# Altium PCB PCB.PcbDoc (part 2 of 7)
Units mm, origin at the board's own origin, x right, y up, seen from the top; angles counter-clockwise.
Board outline 78.8 x 69 mm, 12 copper layers (Top Layer, GND_12, uStrip1, GND_35, Clocks, GND_57, POWER, Slow_Ctrl, GND_810, uStrip2, GND_1012, Bottom Layer), stack 2.926 mm thick; 290 components, 212 nets, 1379 pads, 3418 vias.
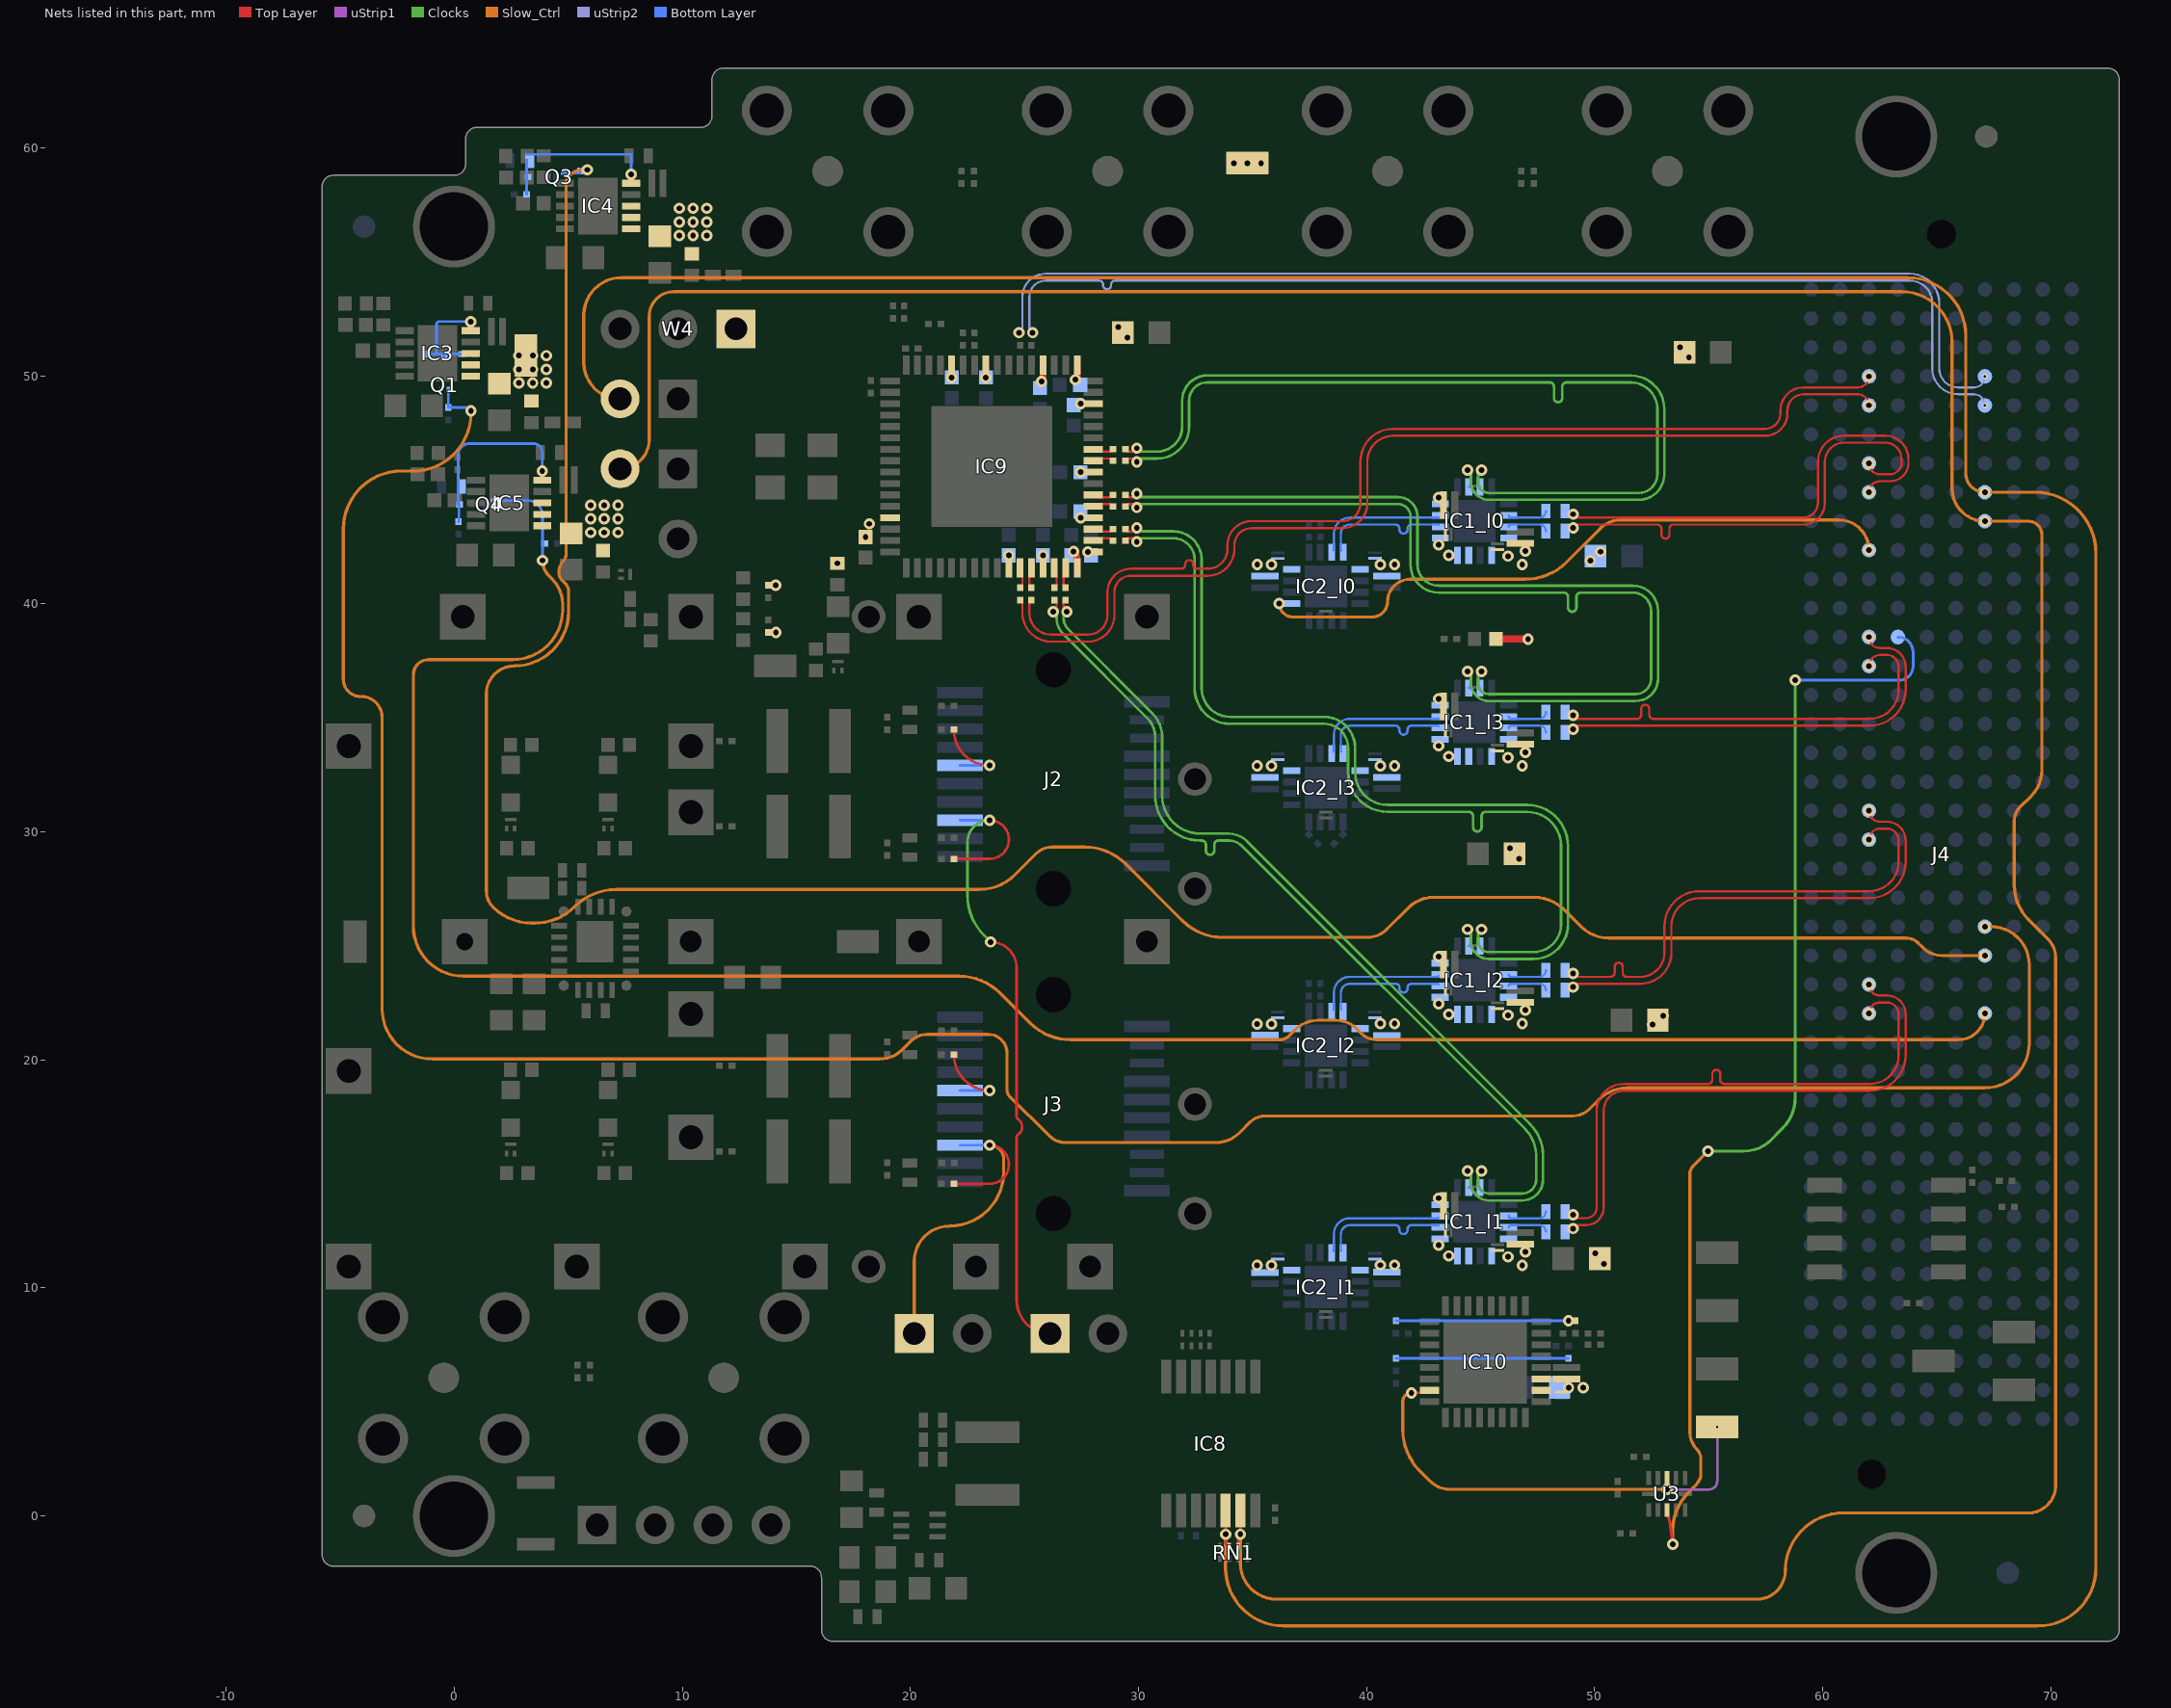
[diagram p12: the nets of this part, all layers, seen from the top]

## Footprints (in the part's own frame and the unit in brackets; to place one, negate y for a bottom-side part, rotate by r counter-clockwise, add the part's x,y. Pads: shape width x height; smd on the part's side, far side on the other; paste and mask are expansions set on the pad) (continued)
SAMTEC_SEAM-40-03.5-S-10-2-A-K-TR [mm]
  round 1.27 hole 1.27 unplated: _1(27.19,0) ""(-27.19,-3.05)
  round 0.64 smd paste+0.125: A1(24.765,5.715) A2(23.495,5.715) A3(22.225,5.715) A4(20.955,5.715) A5(19.685,5.715) A6(18.415,5.715) A7(17.145,5.715) A8(15.875,5.715) A9(14.605,5.715) A10(13.335,5.715) A11(12.065,5.715) A12(10.795,5.715) A13(9.525,5.715) A14(8.255,5.715) A15(6.985,5.715) A16(5.715,5.715) A17(4.445,5.715) A18(3.175,5.715) A19(1.905,5.715) A20(0.635,5.715) A21(-0.635,5.715) A22(-1.905,5.715) A23(-3.175,5.715) A24(-4.445,5.715) A25(-5.715,5.715) A26(-6.985,5.715) A27(-8.255,5.715) A28(-9.525,5.715) A29(-10.795,5.715) A30(-12.065,5.715) A31(-13.335,5.715) A32(-14.605,5.715) A33(-15.875,5.715) A34(-17.145,5.715) A35(-18.415,5.715) A36(-19.685,5.715) A37(-20.955,5.715) A38(-22.225,5.715) A39(-23.495,5.715) A40(-24.765,5.715) B1(24.765,4.445) B2(23.495,4.445) B3(22.225,4.445) B4(20.955,4.445) B5(19.685,4.445) B6(18.415,4.445) B7(17.145,4.445) B8(15.875,4.445) B9(14.605,4.445) B10(13.335,4.445) B11(12.065,4.445) B12(10.795,4.445) B13(9.525,4.445) B14(8.255,4.445) B15(6.985,4.445) B16(5.715,4.445) B17(4.445,4.445) B18(3.175,4.445) B19(1.905,4.445) B20(0.635,4.445) B21(-0.635,4.445) B22(-1.905,4.445) B23(-3.175,4.445) B24(-4.445,4.445) B25(-5.715,4.445) B26(-6.985,4.445) B27(-8.255,4.445) B28(-9.525,4.445) B29(-10.795,4.445) B30(-12.065,4.445) B31(-13.335,4.445) B32(-14.605,4.445) B33(-15.875,4.445) B34(-17.145,4.445) B35(-18.415,4.445) B36(-19.685,4.445) B37(-20.955,4.445) B38(-22.225,4.445) B39(-23.495,4.445) B40(-24.765,4.445) C1(24.765,3.175) C2(23.495,3.175) C3(22.225,3.175) C4(20.955,3.175) C5(19.685,3.175) C6(18.415,3.175) C7(17.145,3.175) C8(15.875,3.175) C9(14.605,3.175) C10(13.335,3.175) C11(12.065,3.175) C12(10.795,3.175) C13(9.525,3.175) C14(8.255,3.175) C15(6.985,3.175) C16(5.715,3.175) C17(4.445,3.175) C18(3.175,3.175) C19(1.905,3.175) C20(0.635,3.175) C21(-0.635,3.175) C22(-1.905,3.175) C23(-3.175,3.175) C24(-4.445,3.175) C25(-5.715,3.175) C26(-6.985,3.175) C27(-8.255,3.175) C28(-9.525,3.175) C29(-10.795,3.175) C30(-12.065,3.175) C31(-13.335,3.175) C32(-14.605,3.175) C33(-15.875,3.175) C34(-17.145,3.175) C35(-18.415,3.175) C36(-19.685,3.175) C37(-20.955,3.175) C38(-22.225,3.175) C39(-23.495,3.175) C40(-24.765,3.175) D1(24.765,1.905) D2(23.495,1.905) D3(22.225,1.905) D4(20.955,1.905) D5(19.685,1.905) D6(18.415,1.905) D7(17.145,1.905) D8(15.875,1.905) D9(14.605,1.905) D10(13.335,1.905) D11(12.065,1.905) D12(10.795,1.905) D13(9.525,1.905) D14(8.255,1.905) D15(6.985,1.905) D16(5.715,1.905) D17(4.445,1.905) D18(3.175,1.905) D19(1.905,1.905) D20(0.635,1.905) D21(-0.635,1.905) D22(-1.905,1.905) D23(-3.175,1.905) D24(-4.445,1.905) D25(-5.715,1.905) D26(-6.985,1.905) D27(-8.255,1.905) D28(-9.525,1.905) D29(-10.795,1.905) D30(-12.065,1.905) D31(-13.335,1.905) D32(-14.605,1.905) D33(-15.875,1.905) D34(-17.145,1.905) D35(-18.415,1.905) D36(-19.685,1.905) D37(-20.955,1.905) D38(-22.225,1.905) D39(-23.495,1.905) D40(-24.765,1.905) E1(24.765,0.635) E2(23.495,0.635) E3(22.225,0.635) E4(20.955,0.635) E5(19.685,0.635) E6(18.415,0.635) E7(17.145,0.635) E8(15.875,0.635) E9(14.605,0.635) E10(13.335,0.635) E11(12.065,0.635) E12(10.795,0.635) E13(9.525,0.635) E14(8.255,0.635) E15(6.985,0.635) E16(5.715,0.635) E17(4.445,0.635) E18(3.175,0.635) E19(1.905,0.635) E20(0.635,0.635) E21(-0.635,0.635) E22(-1.905,0.635) E23(-3.175,0.635) E24(-4.445,0.635) E25(-5.715,0.635) E26(-6.985,0.635) E27(-8.255,0.635) E28(-9.525,0.635) E29(-10.795,0.635) E30(-12.065,0.635) E31(-13.335,0.635) E32(-14.605,0.635) E33(-15.875,0.635) E34(-17.145,0.635) E35(-18.415,0.635) E36(-19.685,0.635) E37(-20.955,0.635) E38(-22.225,0.635) E39(-23.495,0.635) E40(-24.765,0.635) F1(24.765,-0.635) F2(23.495,-0.635) F3(22.225,-0.635) F4(20.955,-0.635) F5(19.685,-0.635) F6(18.415,-0.635) F7(17.145,-0.635) F8(15.875,-0.635) F9(14.605,-0.635) F10(13.335,-0.635) F11(12.065,-0.635) F12(10.795,-0.635) F13(9.525,-0.635) F14(8.255,-0.635) F15(6.985,-0.635) F16(5.715,-0.635) F17(4.445,-0.635) F18(3.175,-0.635) F19(1.905,-0.635) F20(0.635,-0.635) F21(-0.635,-0.635) F22(-1.905,-0.635) F23(-3.175,-0.635) F24(-4.445,-0.635) F25(-5.715,-0.635) F26(-6.985,-0.635) F27(-8.255,-0.635) F28(-9.525,-0.635) F29(-10.795,-0.635) F30(-12.065,-0.635) F31(-13.335,-0.635) F32(-14.605,-0.635) F33(-15.875,-0.635) F34(-17.145,-0.635) F35(-18.415,-0.635) F36(-19.685,-0.635) F37(-20.955,-0.635) F38(-22.225,-0.635) F39(-23.495,-0.635) F40(-24.765,-0.635) G1(24.765,-1.905) G2(23.495,-1.905) G3(22.225,-1.905) G4(20.955,-1.905) G5(19.685,-1.905) G6(18.415,-1.905) G7(17.145,-1.905) G8(15.875,-1.905) G9(14.605,-1.905) G10(13.335,-1.905) G11(12.065,-1.905) G12(10.795,-1.905) G13(9.525,-1.905) G14(8.255,-1.905) G15(6.985,-1.905) G16(5.715,-1.905) G17(4.445,-1.905) G18(3.175,-1.905) G19(1.905,-1.905) G20(0.635,-1.905) G21(-0.635,-1.905) G22(-1.905,-1.905) G23(-3.175,-1.905) G24(-4.445,-1.905) G25(-5.715,-1.905) G26(-6.985,-1.905) G27(-8.255,-1.905) G28(-9.525,-1.905) G29(-10.795,-1.905) G30(-12.065,-1.905) G31(-13.335,-1.905) G32(-14.605,-1.905) G33(-15.875,-1.905) G34(-17.145,-1.905) G35(-18.415,-1.905) G36(-19.685,-1.905) G37(-20.955,-1.905) G38(-22.225,-1.905) G39(-23.495,-1.905) G40(-24.765,-1.905) H1(24.765,-3.175) H2(23.495,-3.175) H3(22.225,-3.175) H4(20.955,-3.175) H5(19.685,-3.175) H6(18.415,-3.175) H7(17.145,-3.175) H8(15.875,-3.175) H9(14.605,-3.175) H10(13.335,-3.175) H11(12.065,-3.175) H12(10.795,-3.175) H13(9.525,-3.175) H14(8.255,-3.175) H15(6.985,-3.175) H16(5.715,-3.175) H17(4.445,-3.175) H18(3.175,-3.175) H19(1.905,-3.175) H20(0.635,-3.175) H21(-0.635,-3.175) H22(-1.905,-3.175) H23(-3.175,-3.175) H24(-4.445,-3.175) H25(-5.715,-3.175) H26(-6.985,-3.175) H27(-8.255,-3.175) H28(-9.525,-3.175) H29(-10.795,-3.175) H30(-12.065,-3.175) H31(-13.335,-3.175) H32(-14.605,-3.175) H33(-15.875,-3.175) H34(-17.145,-3.175) H35(-18.415,-3.175) H36(-19.685,-3.175) H37(-20.955,-3.175) H38(-22.225,-3.175) H39(-23.495,-3.175) H40(-24.765,-3.175) I1(24.765,-4.445) I2(23.495,-4.445) I3(22.225,-4.445) I4(20.955,-4.445) I5(19.685,-4.445) I6(18.415,-4.445) I7(17.145,-4.445) I8(15.875,-4.445) I9(14.605,-4.445) I10(13.335,-4.445) I11(12.065,-4.445) I12(10.795,-4.445) I13(9.525,-4.445) I14(8.255,-4.445) I15(6.985,-4.445) I16(5.715,-4.445) I17(4.445,-4.445) I18(3.175,-4.445) I19(1.905,-4.445) I20(0.635,-4.445) I21(-0.635,-4.445) I22(-1.905,-4.445) I23(-3.175,-4.445) I24(-4.445,-4.445) I25(-5.715,-4.445) I26(-6.985,-4.445) I27(-8.255,-4.445) I28(-9.525,-4.445) I29(-10.795,-4.445) I30(-12.065,-4.445) I31(-13.335,-4.445) I32(-14.605,-4.445) I33(-15.875,-4.445) I34(-17.145,-4.445) I35(-18.415,-4.445) I36(-19.685,-4.445) I37(-20.955,-4.445) I38(-22.225,-4.445) I39(-23.495,-4.445) I40(-24.765,-4.445) J1(24.765,-5.715) J2(23.495,-5.715) J3(22.225,-5.715) J4(20.955,-5.715) J5(19.685,-5.715) J6(18.415,-5.715) J7(17.145,-5.715) J8(15.875,-5.715) J9(14.605,-5.715) J10(13.335,-5.715) J11(12.065,-5.715) J12(10.795,-5.715) J13(9.525,-5.715) J14(8.255,-5.715) J15(6.985,-5.715) J16(5.715,-5.715) J17(4.445,-5.715) J18(3.175,-5.715) J19(1.905,-5.715) J20(0.635,-5.715) J21(-0.635,-5.715) J22(-1.905,-5.715) J23(-3.175,-5.715) J24(-4.445,-5.715) J25(-5.715,-5.715) J26(-6.985,-5.715) J27(-8.255,-5.715) J28(-9.525,-5.715) J29(-10.795,-5.715) J30(-12.065,-5.715) J31(-13.335,-5.715) J32(-14.605,-5.715) J33(-15.875,-5.715) J34(-17.145,-5.715) J35(-18.415,-5.715) J36(-19.685,-5.715) J37(-20.955,-5.715) J38(-22.225,-5.715) J39(-23.495,-5.715) J40(-24.765,-5.715)
  silkscreen extent -27.89,-7.34 29.3,7.34, body extent -27.89,-7.34 28.78,7.34, height 7.04
SAMTEC_SMA-J-P-H-ST-MT1 [mm] "50 Ohms SMA Straight Mixed Technology PCB Jack"
  round 1.35 smd: 1(0,0)
  round 2.2 hole 1.5: 2(2.665,-2.665) 2_1(2.665,2.665) 2_2(-2.665,-2.665) 2_3(-2.665,2.665)
  silkscreen extent -3.17,-3.17 3.17,3.17, body extent -3.17,-3.17 3.18,3.18, height 7.95
SOIC127P600X175-8N [mm]
  rect 1.525x0.65 smd: 1(-2.712,1.905) 2(-2.712,0.635) 3(-2.712,-0.635) 4(-2.712,-1.905) 5(2.712,-1.905) 6(2.712,-0.635) 7(2.712,0.635) 8(2.712,1.905)
  silkscreen extent -3.47,-2.45 1.6,2.58, body extent -3,-2.45 3,2.45, height 1.75
SON50P300X300X85-11N-D [mm]
  rect 0.8x0.3 smd: 1(-1.45,1) 2(-1.45,0.5) 3(-1.45,0) 4(-1.45,-0.5) 5(-1.45,-1) 6(1.45,-1) 7(1.45,-0.5) 8(1.45,0) 9(1.45,0.5) 10(1.45,1)
  rect 1.74x2.48 smd: 11(0,0)
  silkscreen extent -1.97,1.53 -1.73,1.77, body extent -1.52,-1.5 1.52,1.5, height 0.76
SOP65P640X120-14N [mm]
  rect 1.475x0.45 smd: 1(-2.938,1.95) 2(-2.938,1.3) 3(-2.938,0.65) 4(-2.938,0) 5(-2.938,-0.65) 6(-2.938,-1.3) 7(-2.938,-1.95) 8(2.938,-1.95) 9(2.938,-1.3) 10(2.938,-0.65) 11(2.938,0) 12(2.938,0.65) 13(2.938,1.3) 14(2.938,1.95)
  silkscreen extent -3.67,-2.5 1.85,2.52, body extent -3.2,-2.5 3.2,2.5, height 1.13
SOT_07SDRLR_TEX [mil]
  rect 28x9 smd paste+0 mask+0: 1(-31.5,19.69) 2(-31.5,0) 3(-31.5,-19.69) 4(31.5,-19.69) 5(31.5,0) 6(31.5,19.69)
  silkscreen extent -71,-39 31,39, body extent -34,-34 34,34, height 24
TP+195X110 [mm]
  rect 1.85x1 smd: 1(0,0)
  body extent -0.8,-0.45 0.8,0.45, height 1.15
TYCO_1888247-1 [mm] "20 Position, Pitch 0.8mm SFP Receptacle (Small Form-factor Pluggable)"
  rect 2x0.5 smd: 1(-4.1,3.395) 2(-4.1,2.595) 3(-4.1,1.795) 4(-4.1,0.995) 5(-4.1,0.195) 6(-4.1,-0.605) 7(-4.1,-1.405) 8(-4.1,-2.205) 9(-4.1,-3.005) 10(-4.1,-3.805) 11(4.1,-3.405) 14(4.1,-1.005) 15(4.1,-0.205) 16(4.1,0.595) 17(4.1,1.395) 20(4.1,3.795)
  rect 1.5x0.4 smd: 12(4.1,-2.605) 13(4.1,-1.805) 18(4.1,2.195) 19(4.1,2.995)
  round 0.5 hole 1.55 unplated mask+0.525: MTG1(0,4.795) MTG2(0,-4.805)
  Top Layer keep-out lines w0.1: -4.34,5.85 -4.34,3.985 -2.78,3.985 -2.78,3.75 2.78,3.75 2.78,4.385 3.94,4.385 3.94,5.85 -4.34,5.85 ; -4.34,-4.395 -2.78,-4.395 -2.78,-3.75 2.78,-3.75 2.78,-3.995 3.94,-3.995 3.94,-5.85 -4.34,-5.85 -4.34,-4.395
  silkscreen extent -42.4,-7.77 6.3,7.77, body extent -4.5,-5.5 4.5,5.5, height 5.22
XTAL_KYOCERA_CX3225SB [mm] "SMD Crystal Kyocera, 4 Pin, 3.2mm L X 2.5mm W X 0.6mm H"
  rect 1.05x1.3 smd: 1(-0.925,1.15) 2(-0.925,-1.15) 3(0.925,-1.15) 4(0.925,1.15)
  silkscreen extent -2.12,-1.65 1.3,1.73, body extent -1.3,-1.65 1.3,1.65, height 0.6

## Part data
C1_l0 C1_l1 C1_l2 C1_l3 C3_l0 C3_l1 C3_l2 C3_l3 C5_l0 C5_l1 C5_l2 C5_l3 C8_l0 C8_l1 C8_l2 C8_l3 C19 C32 C41 C104: library part "Capacitor - non polarized", "LLL153C70G474ME17"
C2_l0 C2_l1 C2_l2 C2_l3 C4_l0 C4_l1 C4_l2 C4_l3 C6_l0 C6_l1 C6_l2 C6_l3 C9_l0 C9_l1 C9_l2 C9_l3 C12_l0 C12_l1 C12_l2 C12_l3 C13_l0 C13_l1 C13_l2 C13_l3 C105: library part "Capacitor - non polarized", "LLL03TR61E333KE01"
C7_l0 C7_l1 C7_l2 C7_l3 C15 C16 C26 C27 C28 C37 C38 C101 C102 C103: library part CC0603_10UF_6.3V_20%_X5R, "C1608X5R1E106M080AC", Case=0603, Manufacturer=GENERIC, Manufacturer1 ComponentHeight=0.95mm, Manufacturer1 Example=KEMET, Manufacturer1 Part Number=C0603C106M9PAC, Manufacturer Part Number=CC0603_10uF_6.3V_20%_X5R, Tolerance=±20%, Voltage=6.3V, Author="CERN DEM JLC", Component Type=Standard, CreateDate=03/12/2007, HelpURL=\\cern.ch\dfs\Applications\Altium\Datasheets\CC0603_X5R_KEMET.pdf, LatestRevisionDate=03/12/2007, Mounted=Yes, Part Description="SMD Multilayer Chip Ceramic Capacitor", Part Number=CC0603_10UF_6.3V_20%_X5R, Pin Count=2, Sense=No, SMD=Yes, Socket=No, Status=Preferred, TC=X5R
C10_l0 C10_l1 C10_l2 C10_l3 C11_l0 C11_l1 C11_l2 C11_l3 C18 C24 C25 C31 C34 C35 C36 C40 C46 C49 C52 C55: library part C0402-22uF-high-density, "GRM155R60J226ME11", Vmax=6.3V
C14 C45 C47 C48 C50 C51 C53 C54 C56 C57 C58 C59 C60 C61 C62 C63 C64 C65 C66 C67 C68 C69 C70 C71 C72 C73 C74 C75 C76 C77 C78 C79 C80 C81 C82 C83 C84 C85 C86 C91 C92 C106 C107: library part C0201-100nF-high-density, "GRM033R61C104KE14", Vmax=16V
C17 C20 C30 C33 C39 C42 C87 C88 C89 C90 C93 C94 C95 C96 C97 C98 C99 C100: library part CC0402_1UF_16V_10%_X5R, "GRM153B30J105ME15", Case=0402, Manufacturer=GENERIC, Manufacturer1 ComponentHeight=0.55mm, Manufacturer1 Example=TDK, Manufacturer1 Part Number=C1005X5R1C105KT, Tolerance=±10%, Voltage=16V, Author="CERN DEM JLC", Component Type=Standard, CreateDate=10/25/2012, HelpURL=\\cern.ch\dfs\Applications\Altium\Datasheets\CC0402_X5R_TDK_C.pdf, LatestRevisionDate=10/25/2012, Manufacturer Part Number=CC0402_1UF_16V_10%_X5R, Mounted=Yes, Part Description="SMD Multilayer Chip Ceramic Capacitor", Part Number=CC0402_1UF_16V_10%_X5R, Pin Count=2, Sense=No, SMD=Yes, Socket=No, Status=Preferred, TC=X5R
C21 C22 C23: library part C0402-22uF-high-density, "GRM155R71E104KE14", Vmax=6.3V
C29 C43 C44: library part C0402-22uF-high-density, "C0402C220J4GACTU", Vmax=6.3V
D1 D2 D3: "Led Green 0402 2mA 2.65V 40mcd 102mW", Package="0402 Kingbright Corporation", Check_prices=https://www.snapeda.com/parts/APHHS1005LZGCK-V/Kingbright/view-part/?ref=eda, MF="Kingbright Corporation", MP=APHHS1005LZGCK-V, SnapEDA_Link=https://www.snapeda.com/parts/APHHS1005LZGCK-V/Kingbright/view-part/?ref=snap
D4: "LED", Arrow Part Number=APTD1608LVBC/D, Manufacturer_Name=Kingbright, Mouser Part Number=604-APTD1608LVBCD, Arrow Price/Stock=https://www.arrow.com/en/products/aptd1608lvbcd/kingbright?utm_currency=USD&region=nac, Datasheet Link=https://componentsearchengine.com/Datasheets/1/APTD1608LVBC_D.pdf, Height=1.1mm, Manufacturer_Part_Number=APTD1608LVBC/D, Mouser Price/Stock=https://www.mouser.co.uk/ProductDetail/Kingbright/APTD1608LVBC-D?qs=6oMev5NRZMEfNSg5xIhlKA%3D%3D
FTG1 FTG2 FTG3 FTG4: library part FIDUCIAL_TARGET_C100-200, "Fiducial Target", Author="CERN DEM JLC", Component Type="Standard (No BOM)", ComponentHeight=0mm, CreateDate=09/02/2010, Family=Fiducial, HelpURL=Undefined, LatestRevisionDate=04/04/2012, Mounted=No, PackageDescription="Round Fiducial Target, Top Layer, 1.0mm, Top Solder 2.0mm, Keepout =2.0mm", Part Description="Round Fiducial Target, Top Layer, 1.0mm, Top Solder 2.0mm, Keepout =2.0mm", Part Number=FIDUCIAL_TARGET_C100-200, Pin Count=1, Sense=No, SMD=Yes, Socket=No, Status=None
IC1_l0 IC1_l1 IC1_l2 IC1_l3: "Integrated Circuit", Manufacturer_Name=onsemi, Mouser Part Number=863-NB7V52MMNG, Arrow Part Number=NB7V52MMNG, Arrow Price/Stock=https://www.arrow.com/en/products/nb7v52mmng/on-semiconductor, Datasheet Link=https://www.onsemi.com/pdf/datasheet/nb7v52m-d.pdf, Height=1mm, Manufacturer_Part_Number=NB7V52MMNG, Mouser Price/Stock=https://www.mouser.co.uk/ProductDetail/ON-Semiconductor/NB7V52MMNG?qs=N5dOQkml4H8i91m%252BmwlaUQ%3D%3D
IC2_l0 IC2_l1 IC2_l2 IC2_l3: "Integrated Circuit", Manufacturer_Name=onsemi, Mouser Part Number=863-NB7VQ14MMNHTBG, Arrow Part Number=NB7VQ14MMNHTBG, Arrow Price/Stock=https://www.arrow.com/en/products/nb7vq14mmnhtbg/on-semiconductor?utm_currency=USD&region=nac, Datasheet Link=http://www.onsemi.com/pub/Collateral/NB7VQ14M-D.PDF, Height=1mm, Manufacturer_Part_Number=NB7VQ14MMNHTBG, Mouser Price/Stock=https://www.mouser.co.uk/ProductDetail/onsemi/NB7VQ14MMNHTBG?qs=3PKVEWFFm2%2FWq%2FFZ4xstfg%3D%3D
IC3 IC4 IC5: "Integrated Circuit", Manufacturer_Name="Analog Devices", Mouser Part Number=584-ADP7159ACPZ04R7, Arrow Part Number=ADP7159ACPZ-04-R7, Arrow Price/Stock=https://www.arrow.com/en/products/adp7159acpz-04-r7/analog-devices, Datasheet Link=https://www.analog.com/media/en/technical-documentation/data-sheets/ADP7159.pdf, Height=0.85mm, Manufacturer_Part_Number=ADP7159ACPZ-04-R7, Mouser Price/Stock=https://www.mouser.co.uk/ProductDetail/Analog-Devices/ADP7159ACPZ-04-R7?qs=JeIcUl65ClBXEAZRPtHUVQ%3D%3D
IC6: library part PT100, "32207590 - PT100 - 1206 - 0.3degC - -50/130"
IC7: "Integrated Circuit", Manufacturer_Name=STMicroelectronics, Mouser Part Number=511-M24C02-RMN6TP, Arrow Part Number=M24C02-RMN6TP, Arrow Price/Stock=https://www.arrow.com/en/products/m24c02-rmn6tp/stmicroelectronics?region=nac, Datasheet Link=http://www.st.com/st-web-ui/static/active/en/resource/technical/document/datasheet/DM00071904.pdf, Height=1.75mm, Manufacturer_Part_Number=M24C02-RMN6TP, Mouser Price/Stock=https://www.mouser.co.uk/ProductDetail/STMicroelectronics/M24C02-RMN6TP?qs=Jodr3Ka7a6ktinv3aZzndw%3D%3D
IC8: "Integrated Circuit", Manufacturer_Name="Texas Instruments", Mouser Part Number=595-TCA9543APWR, Arrow Part Number=TCA9543APWR, Arrow Price/Stock=https://www.arrow.com/en/products/tca9543apwr/texas-instruments?utm_currency=USD&region=europe, Datasheet Link=http://www.ti.com/lit/gpn/tca9543a, Height=1.2mm, Manufacturer_Part_Number=TCA9543APWR, Mouser Price/Stock=https://www.mouser.co.uk/ProductDetail/Texas-Instruments/TCA9543APWR?qs=p08Uhw9w2Fzm36ZpNDVXHw%3D%3D
IC9: "Integrated Circuit", Manufacturer_Name=Skyworks, Mouser Part Number=634-SI5345B-D-GM, Datasheet Link=https://www.mouser.sg/datasheet/2/472/si5345_44_42_d_datasheet-2507675.pdf, Height=0.9mm, Manufacturer_Part_Number=SI5345B-D-GM, Mouser Price/Stock=https://www.mouser.co.uk/ProductDetail/Skyworks-Solutions-Inc/SI5345B-D-GM?qs=p9T7GgSe1IGHqFUKlxUKrA%3D%3D
IC10: "Integrated Circuit", Manufacturer_Name="Peregrine Semiconductor", Mouser Part Number=81-PE44820B-X, Datasheet Link=https://www.psemi.com/pdf/datasheets/pe44820ds.pdf, Height=0.9mm, Manufacturer_Part_Number=PE44820B-X, Mouser Price/Stock=https://www.mouser.co.uk/ProductDetail/pSemi/PE44820B-X?qs=Cb2nCFKsA8prCrkfl5FDIQ%3D%3D
J1: "Connector", Arrow Part Number=2007263-1, Manufacturer_Name="TE Connectivity", Mouser Part Number=571-2007263-1, Arrow Price/Stock=https://www.arrow.com/en/products/2007263-1/te-connectivity?region=europe, Datasheet Link=https://www.te.com/commerce/DocumentDelivery/DDEController?Action=srchrtrv&DocNm=4-1773455-3_Quick_Ref_Guide_SFP%2B_Sol&DocType=Data%20Sheet&DocLang=English&PartCntxt=2007263-1&DocFormat=pdf, Height=9.8mm, Manufacturer_Part_Number=2007263-1, Mouser Price/Stock=https://www.mouser.co.uk/ProductDetail/TE-Connectivity/2007263-1?qs=4zF2lffhceF8GItBX4M8mw%3D%3D
J2 J3: library part TYCO_1888247-1, "20 Position SFP+ Connector (Small Form-factor Pluggable)", Manufacturer="TYCO ELECTRONICS", Manufacturer Part Number=1888247-1, Author="CERN DEM JLC", Component Type=Standard, ComponentHeight=5.4mm, CreateDate=2/27/2012, Family=SFP+, HelpURL=\\cern.ch\dfs\Applications\Altium\Datasheets\TYCO_1888247-1.pdf, LatestRevisionDate=2/27/2012, Mounted=Yes, Part Description="20 Position, Pitch 0.8mm SFP+ Receptacle (Small Form-factor Pluggable)", Part Number=TYCO_1888247-1, Pin Count=20, PressFit=No, Sense=No, SMD=Yes, Socket=No, Status=None
J4 TP1 TP2 TP3 TP4 TP5 TP6 TP7 TP8 TP9 TP10 TP11 TP12 TP13: Package=None, Availability=Unavailable, Price=None
  J4: MF=Samtec, MP=SEAM-40-03.5-S-10-2-A-K-TR
  TP1 TP2 TP3 TP4 TP5 TP6 TP7 TP8 TP9 TP10 TP11 TP12 TP13: MF="{'manufacturer': u'TE Connectivity AMP Connectors'}", MP=RCU-0C
J5 J6 J7 J8 J9 J10: library part SAMTEC_SMA-J-P-H-ST-MT1, Manufacturer=SAMTEC, Manufacturer Part Number=SMA-J-P-H-ST-MT1, Author="CERN DEM HF", Component Type=Standard, ComponentHeight=7.95mm, CreateDate=5/24/2023, Family=SMA, HelpURL=\\cern.ch\dfs\Applications\Altium\Datasheets\SAMTEC_SMA-J-P-H-ST-MT1.pdf, LatestRevisionDate=5/24/2023, Mounted=Yes, Part Description="50 Ohms SMA Straight Mixed Technology PCB Jack", Part Number=SAMTEC_SMA-J-P-H-ST-MT1, Pin Count=5, PressFit=No, Sense=Yes, Sense Comment="assembly limitations", SMD=Yes, Socket=No, Status="Not Recommended"
L1 L2 L3 L4 L5: library part DFE322520FD-4R7M=P2, "Inductor", Arrow Part Number=DFE322520FD-4R7M=P2, Manufacturer_Name="Murata Electronics", Mouser Part Number=81-DFE322520FD4R7MP2, Arrow Price/Stock=https://www.arrow.com/en/products/dfe322520fd-4r7mp2/murata-manufacturing?region=nac, Datasheet Link=https://search.murata.co.jp/Ceramy/image/img/P02/J(E)TE243A-9104.pdf, Height=2mm, Manufacturer_Part_Number=DFE322520FD-4R7M=P2, Mouser Price/Stock=https://www.mouser.co.uk/ProductDetail/Murata-Electronics/DFE322520FD-4R7M%3dP2?qs=17u8i%2FzlE8%252BgAY54mivQ1g%3D%3D
LED1 LED2 LED3 LED4: "Led Red 0603 2mA 1.8V 50mcd 84mW", Mfr_Name=Kingbright
Q1 Q2 Q3 Q4 Q5 Q6 Q7 Q8 Q10: "MOSFET (N-Channel)", Manufacturer_Name="Texas Instruments", Mouser Part Number=595-CSD15380F3, Arrow Part Number=CSD15380F3, Arrow Price/Stock=https://www.arrow.com/en/products/csd15380f3/texas-instruments?region=nac, Datasheet Link=https://www.ti.com/lit/ds/symlink/csd15380f3.pdf?ts=1641221366106&ref_url=https%253A%252F%252Fwww.google.com%252F, Height=0.35mm, Manufacturer_Part_Number=CSD15380F3, Mouser Price/Stock=https://www.mouser.co.uk/ProductDetail/Texas-Instruments/CSD15380F3?qs=zEmsApcVOkXP46xhm0edmA%3D%3D
Q9: library part XTAL_48MHZ_KYOCERA_CX3225SB48000D0FPJC1, "Crystal 4 pins 1=XTAL Control 2=GND3=XTAL 4=GND", Manufacturer=KYOCERA, Manufacturer Part Number=CX3225SB48000D0FPJC1, Author="CERN DEM JLC", Bonding=No, Component Type=Standard, ComponentHeight=0.6mm, CreateDate=6/5/2018, HelpURL=\\cern.ch\dfs\Applications\Altium\Datasheets\XTAL_KYOCERA_CX3225SB.pdf, LatestRevisionDate=6/5/2018, Mounted=Yes, PackageDescription="SMD Crystal Kyocera, 4 Pins, 2.50mm L X 3.20mm W X 0.6mm H", Part Description="Tolerance: ±10ppm, Stability: ±15ppm, 8pF, -40°C to +85°C, Surface Mount Crystal", Part Number=XTAL_48MHZ_KYOCERA_CX3225SB48000D0FPJC1, Pin Count=4, PressFit=No, Sense=No, SMD=Yes, Socket=No
R1 R4 R17 R21 R23 R24 R25 R27 R30 R31 R32 R35 R38 R39 R40 R43 R44 R45 R46 R47 R48 R49 R53 R54: library part R0201-100ohm-high-density, "Resistor 10k"
R2 R22 R26 R50 R51 R52 R59B R60B R61X R62X R63B R64B R65X R66X: library part R0201-100ohm-high-density, "Resistor"
R3 R8 R15 R57: library part R0402_750R_1%_0.0625W_100PPM, "Resistor - 1%", Case=0402, Manufacturer=GENERIC, Manufacturer1 ComponentHeight=0.4mm, Manufacturer1 Example="YAGEO PHYCOMP", Manufacturer1 Part Number=232270677501L, Power=0.0625W, Tolerance=±1%, Author="CERN DEM JLC", Component Type=Standard, CreateDate=12/3/2007, HelpURL=\\cern.ch\dfs\Applications\Altium\Datasheets\R0402_Phycomp_RC0402.pdf, LatestRevisionDate=10/17/2012, Manufacturer Part Number=R0402_750R_1%_0.0625W_100PPM, Mounted=Yes, Part Description="General Purpose Thick Film Chip Resistor", Part Number=R0402_750R_1%_0.0625W_100PPM, Pin Count=2, PressFit=No, Sense=No, SMD=Yes, Socket=No, Status="Not Recommended", TC=±100ppm/°C
R5 R11: library part R0402_47K_1%_0.0625W_100PPM, "Resistor - 1%", Case=0402, Manufacturer=GENERIC, Manufacturer1 ComponentHeight=0.4mm, Manufacturer1 Example="YAGEO PHYCOMP", Manufacturer1 Part Number=232270674703L, Power=0.0625W, Tolerance=±1%, Author="CERN DEM JLC", Component Type=Standard, CreateDate=12/3/2007, HelpURL=\\cern.ch\dfs\Applications\Altium\Datasheets\R0402_Phycomp_RC0402.pdf, LatestRevisionDate=10/17/2012, Manufacturer Part Number=R0402_47K_1%_0.0625W_100PPM, Mounted=Yes, Part Description="General Purpose Thick Film Chip Resistor", Part Number=R0402_47K_1%_0.0625W_100PPM, Pin Count=2, PressFit=No, Sense=No, SMD=Yes, Socket=No, Status="Not Recommended", TC=±100ppm/°C
R6 R12: library part R0402_27K_1%_0.0625W_100PPM, "Resistor - 1%", Case=0402, Manufacturer=GENERIC, Manufacturer1 ComponentHeight=0.4mm, Manufacturer1 Example="YAGEO PHYCOMP", Manufacturer1 Part Number=232270672703L, Power=0.0625W, Tolerance=±1%, Author="CERN DEM JLC", Component Type=Standard, CreateDate=12/3/2007, HelpURL=\\cern.ch\dfs\Applications\Altium\Datasheets\R0402_Phycomp_RC0402.pdf, LatestRevisionDate=10/17/2012, Manufacturer Part Number=R0402_27K_1%_0.0625W_100PPM, Mounted=Yes, Part Description="General Purpose Thick Film Chip Resistor", Part Number=R0402_27K_1%_0.0625W_100PPM, Pin Count=2, PressFit=No, Sense=No, SMD=Yes, Socket=No, Status="Not Recommended", TC=±100ppm/°C
R7 R10 R13 R14 R16: library part R0603_30K_1%_0.1W_100PPM, "Resistor - 1%", Case=0603, Manufacturer=GENERIC, Manufacturer1 ComponentHeight=0.55mm, Manufacturer1 Example="NIC COMPONENT", Manufacturer1 Part Number=NRC06F3002TRF, Power=0.1W, Tolerance=±1%, Author="CERN DEM JLC", Component Type=Standard, CreateDate=12/3/2007, HelpURL=\\cern.ch\dfs\Applications\Altium\Datasheets\R0603_NIC_NRC.pdf, LatestRevisionDate=3/13/2008, Manufacturer Part Number=R0603_30K_1%_0.1W_100PPM, Mounted=Yes, Part Description="General Purpose Thick Film Chip Resistor", Part Number=R0603_30K_1%_0.1W_100PPM, Pin Count=2, PressFit=No, Sense=No, SMD=Yes, Socket=No, Status=Preferred, TC=±100ppm/°C
R9: library part R0603_150K_1%_0.1W_100PPM, "Resistor - 1%", Case=0603, Manufacturer=GENERIC, Manufacturer1 ComponentHeight=0.55mm, Manufacturer1 Example="NIC COMPONENT", Manufacturer1 Part Number=NRC06F1503TRF, Power=0.1W, Tolerance=±1%, Author="CERN DEM JLC", Component Type=Standard, CreateDate=12/3/2007, HelpURL=\\cern.ch\dfs\Applications\Altium\Datasheets\R0603_NIC_NRC.pdf, LatestRevisionDate=3/13/2008, Manufacturer Part Number=R0603_150K_1%_0.1W_100PPM, Mounted=Yes, Part Description="General Purpose Thick Film Chip Resistor", Part Number=R0603_150K_1%_0.1W_100PPM, Pin Count=2, PressFit=No, Sense=No, SMD=Yes, Socket=No, Status=Preferred, TC=±100ppm/°C
R18 R33 R34 R41 R42 R58: library part R0402_200K_1%_0.0625W_100PPM, "Resistor - 1%", Case=0402, Manufacturer=GENERIC, Manufacturer1 ComponentHeight=0.4mm, Manufacturer1 Example="YAGEO PHYCOMP", Manufacturer1 Part Number=232270672004L, Power=0.0625W, Tolerance=±1%, Author="CERN DEM JLC", Component Type=Standard, CreateDate=12/3/2007, HelpURL=\\cern.ch\dfs\Applications\Altium\Datasheets\R0402_Phycomp_RC0402.pdf, LatestRevisionDate=10/17/2012, Manufacturer Part Number=R0402_200K_1%_0.0625W_100PPM, Mounted=Yes, Part Description="General Purpose Thick Film Chip Resistor", Part Number=R0402_200K_1%_0.0625W_100PPM, Pin Count=2, PressFit=No, Sense=No, SMD=Yes, Socket=No, Status="Not Recommended", TC=±100ppm/°C
R19: library part R0402_20K_1%_0.0625W_100PPM, "Resistor - 1%", Case=0402, Manufacturer=GENERIC, Manufacturer1 ComponentHeight=0.4mm, Manufacturer1 Example="YAGEO PHYCOMP", Manufacturer1 Part Number=232270672003L, Power=0.0625W, Tolerance=±1%, Author="CERN DEM JLC", Component Type=Standard, CreateDate=12/3/2007, HelpURL=\\cern.ch\dfs\Applications\Altium\Datasheets\R0402_Phycomp_RC0402.pdf, LatestRevisionDate=10/17/2012, Manufacturer Part Number=R0402_20K_1%_0.0625W_100PPM, Mounted=Yes, Part Description="General Purpose Thick Film Chip Resistor", Part Number=R0402_20K_1%_0.0625W_100PPM, Pin Count=2, PressFit=No, Sense=No, SMD=Yes, Socket=No, Status="Not Recommended", TC=±100ppm/°C
R20: library part R0402_5K1_1%_0.0625W_100PPM, "Resistor - 1%", Case=0402, Manufacturer=GENERIC, Manufacturer1 ComponentHeight=0.4mm, Manufacturer1 Example="YAGEO PHYCOMP", Manufacturer1 Part Number=232270675102L, Power=0.0625W, Tolerance=±1%, Author="CERN DEM JLC", Component Type=Standard, CreateDate=03/12/2007, HelpURL=\\cern.ch\dfs\Applications\Altium\Datasheets\R0402_Phycomp_RC0402.pdf, LatestRevisionDate=17/10/2012, Manufacturer Part Number=R0402_5K1_1%_0.0625W_100PPM, Mounted=Yes, Part Description="General Purpose Thick Film Chip Resistor", Part Number=R0402_5K1_1%_0.0625W_100PPM, Pin Count=2, PressFit=No, Sense=No, SMD=Yes, Socket=No, Status="Not Recommended", TC=±100ppm/°C
R28 R29 R36 R37: library part R0402_1K5_1%_0.0625W_100PPM, "Resistor - 1%", Case=0402, Manufacturer=GENERIC, Manufacturer1 ComponentHeight=0.4mm, Manufacturer1 Example="YAGEO PHYCOMP", Manufacturer1 Part Number=232270671502L, Power=0.0625W, Tolerance=±1%, Author="CERN DEM JLC", Component Type=Standard, CreateDate=12/3/2007, HelpURL=\\cern.ch\dfs\Applications\Altium\Datasheets\R0402_Phycomp_RC0402.pdf, LatestRevisionDate=10/17/2012, Manufacturer Part Number=R0402_1K5_1%_0.0625W_100PPM, Mounted=Yes, Part Description="General Purpose Thick Film Chip Resistor", Part Number=R0402_1K5_1%_0.0625W_100PPM, Pin Count=2, PressFit=No, Sense=No, SMD=Yes, Socket=No, Status="Not Recommended", TC=±100ppm/°C
R55 R56: library part R0402_22R_1%_0.0625W_100PPM, "Resistor - 1%", Case=0402, Manufacturer=GENERIC, Manufacturer1 ComponentHeight=0.4mm, Manufacturer1 Example="YAGEO PHYCOMP", Manufacturer1 Part Number=232270672209L, Power=0.0625W, Tolerance=±1%, Author="CERN DEM JLC", Component Type=Standard, CreateDate=12/3/2007, HelpURL=\\cern.ch\dfs\Applications\Altium\Datasheets\R0402_Phycomp_RC0402.pdf, LatestRevisionDate=10/17/2012, Manufacturer Part Number=R0402_22R_1%_0.0625W_100PPM, Mounted=Yes, Part Description="General Purpose Thick Film Chip Resistor", Part Number=R0402_22R_1%_0.0625W_100PPM, Pin Count=2, PressFit=No, Sense=No, SMD=Yes, Socket=No, Status="Not Recommended", TC=±100ppm/°C
RN1 RN2: "Resistor Network (8-Pin) 10k", Manufacturer_Name=Panasonic, Mouser Part Number=667-EXB-U18103JX, Datasheet Link=https://industrial.panasonic.com/cdbs/www-data/pdf/AOC0000/AOC0000C20.pdf, Height=0.45mm, Manufacturer_Part_Number=EXB-U18103JX, Mouser Price/Stock=https://www.mouser.com/Search/Refine.aspx?Keyword=667-EXB-U18103JX
U1 U3: "No Description Available", Mfr_Name="Texas Instruments", RefDes=RefDes
  U1: Type="Power Management"
  U3: Type=Type
U2: library part XPSM82866AA0SRDJR, "No Description Available", Mfr_Name="Texas Instruments", RefDes=RefDes, Type=TYPE
W1 W2 W5 W6: library part SAMTEC_HTSW-102-23-L-S, "2 Mini Wire-Wrap Contact Strip Header", Manufacturer=SAMTEC, Manufacturer Part Number=HTSW-102-23-L-S, Author="CERN DEM JLC", Component Type=Standard, ComponentHeight=8.38mm, CreateDate=2/22/2018, Family="Header 2", HelpURL=\\cern.ch\dfs\Applications\Altium\Datasheets\SAMTEC_HTSW-102-23-L-S.pdf, LatestRevisionDate=2/22/2018, Mounted=Yes, Part Description="2 Contacts, Pitch 2.54mm, Single Row  Through Mount Straight Header (Post Lead 5.84mm, Tail Lead 2.92mm, Insulator 2.54mm)", Part Number=SAMTEC_HTSW-102-23-L-S, Pin Count=2, PressFit=No, Sense=No, SMD=No, Socket=No, Status=Preferred, Status Comment="High Temperature"
W3: library part SAMTEC_HTSW-104-23-L-S, "4 Mini Wire-Wrap Contact Strip Header", Manufacturer=SAMTEC, Manufacturer Part Number=HTSW-104-23-L-S, Author="CERN DEM JLC", Component Type=Standard, ComponentHeight=8.38mm, CreateDate=2/22/2018, Family="Header 4", HelpURL=\\cern.ch\dfs\Applications\Altium\Datasheets\SAMTEC_HTSW-104-23-L-S.pdf, LatestRevisionDate=2/22/2018, Mounted=Yes, Part Description="4 Contacts, Pitch 2.54mm, Single Row  Through Mount Straight Header (Post Lead 5.84mm, Tail Lead 2.92mm, Insulator 2.54mm)", Part Number=SAMTEC_HTSW-104-23-L-S, Pin Count=4, PressFit=No, Sense=No, SMD=No, Socket=No, Status=Preferred, Status Comment="High Temperature"
W4: library part SAMTEC_HTSW-103-23-L-S, "3 Mini Wire-Wrap Contact Strip Header", Manufacturer=SAMTEC, Manufacturer Part Number=HTSW-103-23-L-S, Author="CERN DEM JLC", Component Type=Standard, ComponentHeight=8.38mm, CreateDate=2/22/2018, Family="Header 3", HelpURL=\\cern.ch\dfs\Applications\Altium\Datasheets\SAMTEC_HTSW-103-23-L-S.pdf, LatestRevisionDate=2/22/2018, Mounted=Yes, Part Description="3 Contacts, Pitch 2.54mm, Single Row Through Mount Straight Header (Post Lead 5.84mm, Tail Lead 2.92mm, Insulator 2.54mm)", Part Number=SAMTEC_HTSW-103-23-L-S, Pin Count=3, PressFit=No, Sense=No, SMD=No, Socket=No, Status=Preferred, Status Comment="High Temperature"
W7: library part SAMTEC_HTSW-101-23-L-S, "Single Mini Wire-Wrap Contact", Manufacturer=SAMTEC, Manufacturer Part Number=HTSW-101-23-L-S, Author="CERN DEM JLC", Component Type=Standard, ComponentHeight=8.38mm, CreateDate=2/22/2018, Family="Header 1", HelpURL=\\cern.ch\dfs\Applications\Altium\Datasheets\SAMTEC_HTSW-101-23-L-S.pdf, LatestRevisionDate=2/22/2018, Mounted=Yes, Part Description="Single Contact Through Mount Straight Header (Post Lead 5.84mm, Tail Lead 2.92mm, Insulator 2.54mm)", Part Number=SAMTEC_HTSW-101-23-L-S, Pin Count=1, PressFit=No, Sense=No, SMD=No, Socket=No, Status=Preferred, Status Comment="High Temperature"

## Free pads (board coordinates)
  round 3.6 hole 3: frame-holes(-0.015,0) frame-holes(-0.015,56.551) frame-holes(63.226,-2.499) frame-holes(63.228,60.499)

## Via types
v1: diameter 0.25, hole 0.1, Top Layer to uStrip1, tented both sides, 895 vias
v2: diameter 0.25, hole 0.1, uStrip2 to Bottom Layer, tented both sides, 888 vias
v3: diameter 0.5, hole 0.25, Top Layer to Bottom Layer, tented both sides, 768 vias
v4: diameter 0.5, hole 0.25, Top Layer to Bottom Layer, 545 vias
v5: diameter 0.5, hole 0.25, uStrip1 to uStrip2, tented both sides, 315 vias
v6: diameter 0.584, hole 0.483, Top Layer to Bottom Layer, tented both sides, 6 vias
v7: diameter 0.5, hole 0.25, uStrip1 to uStrip2, 1 vias

## Nets (pads, with @x,y where several pads share a name; then routed paths per layer and width w, separated by ;. In a path a pad name is that pad's centre, name@x,y a point inside that pad or via, vN(x,y) a via of type N, cw(c..) or ccw(c..) an arc to the next point about the centre after c; other vN are vias at no path point)
1V8: C1_l0.2 C1_l1.2 C1_l2.2 C1_l3.2 C2_l0.2 C2_l1.2 C2_l2.2 C2_l3.2 C3_l0.2 C3_l1.2 C3_l2.2 C3_l3.2 C4_l0.2 C4_l1.2 C4_l2.2 C4_l3.2 C5_l0.2 C5_l1.2 C5_l2.2 C5_l3.2 C6_l0.2 C6_l1.2 C6_l2.2 C6_l3.2 C7_l0.2 C7_l1.2 C7_l2.2 C7_l3.2 C8_l0.2 C8_l1.2 C8_l2.2 C8_l3.2 C9_l0.2 C9_l1.2 C9_l2.2 C9_l3.2 C38.2 C88.2 C89.2 C90.2 C93.2 C94.2 C95.2 C96.2 C97.2 C98.2 C99.2 C100.2 C101.2 C102.2 IC1_l0.1 IC1_l0.4 IC1_l0.12 IC1_l0.13 IC1_l0.15 IC1_l0.16 IC1_l1.1 IC1_l1.4 IC1_l1.12 IC1_l1.13 IC1_l1.15 IC1_l1.16 IC1_l2.1 IC1_l2.4 IC1_l2.12 IC1_l2.13 IC1_l2.15 IC1_l2.16 IC1_l3.1 IC1_l3.4 IC1_l3.12 IC1_l3.13 IC1_l3.15 IC1_l3.16 IC2_l0.8 IC2_l0.13 IC2_l1.8 IC2_l1.13 IC2_l2.8 IC2_l2.13 IC2_l3.8 IC2_l3.13 IC5.1 IC5.2 IC5.3 IC9.26 IC9.29 IC9.32 IC9.33 IC9.36 IC9.40 IC9.46 IC9.49 IC9.52 IC9.57 IC9.60 R18.1 R20.2 R53.2 R54.2 W4.1 | length 3.5
  Top Layer w0.3: v3@25.808,49.834 IC9.52@25.808,50.48 ; v3(27.156,42.303) cw(c26.787,41.934) 27.308,41.934 IC9.32@27.308,41.58 ; v3@27.308,49.834 IC9.49@27.308,50.48 ; R20.2@45.677,38.467 47.069,38.467 v3(47.077,38.458)
  other v3: 35.204,10.996 35.825,10.996 46.824,10.995 40.605,11.004 41.227,11.003 46.204,11.366 43.603,11.407 46.967,11.587 43.157,11.873 43.157,13.94 35.204,21.582 35.825,21.583 40.605,21.591 41.227,21.59 46.824,21.595 46.204,21.965 43.603,21.997 46.967,22.186 43.157,22.463 43.157,24.53 35.204,32.896 35.825,32.897 46.824,32.894 40.605,32.905 41.227,32.904 46.204,33.265 43.603,33.311 46.967,33.486 43.157,33.777 43.157,35.844 14.101,38.748 14.099,40.818 35.205,41.723 35.826,41.723 40.607,41.731 41.228,41.73 46.826,41.726 46.206,42.097 24.308,42.13 25.808,42.13 43.604,42.134 27.78,42.279 46.968,42.318 43.158,42.6 27.458,43.78 43.158,44.667 27.458,45.78 27.458,48.78 25.745,49.756 27.232,49.834 21.808,49.93 23.308,49.93
  other v4: 50.413,11.06 50.02,11.518 52.543,21.547 53.001,21.94 46.681,28.82 46.288,29.278 49.805,41.899 50.263,42.291 5.976,43.135 6.576,43.135 7.176,43.135 5.976,43.735 6.576,43.735 7.176,43.735 5.976,44.335 6.576,44.335 7.176,44.335 54.134,50.805 53.742,51.263 29.504,51.679 29.112,52.137
1V8_DIS: J4.D26 Q4.1 R27.1 | length 98.4
  Slow_Ctrl w0.137: v3(3.87,41.909) ccw(c4.831,41.909) 4.152,41.229 4.301,41.08 cw(c3.216,39.994) 4.75,39.994 4.75,39.742 cw(c2.568,39.742) 2.568,37.56 -1.131,37.56 ccw(c-1.131,36.896) -1.794,36.896 -1.794,25.864 ccw(c0.392,25.864) 0.392,23.677 22.136,23.677 cw(c22.136,21.137) 23.932,22.933 25.242,21.624 ccw(c27.02,23.403) 27.02,20.887 36.216,20.887 ccw(c36.216,21.392) 36.573,21.035 36.851,21.312 cw(c37.883,20.28) 37.883,21.74 38.664,21.74 cw(c38.664,20.443) 39.582,21.36 39.792,21.15 ccw(c40.427,21.785) 40.427,20.887 65.954,20.887 ccw(c65.954,22.04) v3(67.108,22.04)
  Bottom Layer w0.117: Q4.1@1.728,44.54 3.194,44.54 cw(c3.194,43.864) 3.87,43.864 v3(3.87,41.909)
1V8_EN: C44.1 IC5.5 R25.2 R26.2 | length 8
  Bottom Layer w0.117: R25.2@0.171,43.605 0.199,43.633 0.199,44.338 R26.2@0.226,44.365 ; R26.2@0.171,44.365 0.171,46.537 cw(c0.668,46.537) 0.668,47.034 3.468,47.034 cw(c3.468,46.644) 3.858,46.644 v3(3.858,45.828)
3V3_APLL_DIS: J4.D23 Q1.1 R4.1 | length 117.5
  Slow_Ctrl w0.137: v3(0.73,48.464) 0.73,48.368 cw(c-1.81,48.368) -1.81,45.828 -2.325,45.828 ccw(c-2.325,43.288) -4.865,43.288 -4.865,36.698 ccw(c-4.106,36.698) -4.106,35.94 -4.078,35.94 cw(c-4.078,35.023) -3.162,35.023 -3.162,22.233 ccw(c-0.972,22.233) -0.972,20.043 18.652,20.043 ccw(c18.652,21.442) 19.642,20.453 20.02,20.831 cw(c20.731,20.12) 20.731,21.126 23.408,21.126 cw(c23.408,20.299) 24.235,20.299 24.235,18.665 ; 24.235,18.664 ccw(c24.576,18.665) 24.335,18.424 26.082,16.677 ccw(c26.796,17.391) 26.796,16.381 33.388,16.381 ccw(c33.388,17.863) 34.128,16.579 ccw(c33.388,17.863) 34.436,16.815 34.893,17.272 cw(c35.552,16.613) 35.552,17.545 49.04,17.545 ccw(c49.04,18.579) 49.771,17.848 50.181,18.258 cw(c51.428,17.011) 50.239,18.314 cw(c51.428,17.011) 51.428,18.774 67.096,18.774 ccw(c67.096,20.733) 69.055,20.733 69.055,24.171 ccw(c67.376,24.171) 67.376,25.85 v3(67.108,25.85)
  Bottom Layer w0.117: R4.1@-0.263,48.618 Q1.1@-0.263,49.404 ; R4.1@-0.181,48.618 0.576,48.618 cw(c0.576,48.464) v3(0.73,48.464)
3V3_PS_DIS: J4.D24 Q3.1 R24.1 | length 105.8
  Slow_Ctrl w0.137: v3(5.834,59.04) 5.604,59.04 ccw(c5.604,58.336) 4.9,58.336 4.9,42.146 cw(c4.571,42.146) 4.803,41.914 ccw(c5.333,41.385) 4.585,41.385 ccw(c5.073,41.385) 4.728,41.04 4.879,40.888 cw(c4.558,40.567) 4.9,40.866 cw(c4.558,40.567) 5.012,40.567 5.012,39.659 cw(c2.634,39.659) 2.634,37.281 ccw(c2.634,36.049) 1.403,36.049 1.403,27.415 ccw(c2.408,27.415) 1.697,26.704 ccw(c3.395,28.402) 3.395,26 3.521,26 ccw(c3.521,28.5) 5.289,26.733 cw(c7.085,24.936) 7.085,27.476 23.02,27.476 ccw(c23.02,29.698) 24.591,28.127 25.521,29.058 cw(c26.204,28.375) 26.204,29.34 27.639,29.34 cw(c27.639,26.8) 28.886,29.013 cw(c27.639,26.8) 29.435,28.596 31.914,26.118 ccw(c33.71,27.914) 33.71,25.374 40.015,25.374 ccw(c40.015,26.614) 40.892,25.737 41.839,26.684 cw(c42.917,25.606) 42.917,27.13 47.36,27.13 cw(c47.36,25.293) 48.576,26.67 cw(c47.36,25.293) 48.659,26.592 49.4,25.851 ccw(c50.623,27.073) 50.623,25.345 63.667,25.345 cw(c63.667,24.598) 64.195,25.126 64.403,24.918 ; 64.403,24.918 ccw(c65.219,25.734) 65.219,24.58 v3(67.108,24.58)
  Bottom Layer w0.117: Q3.1@4.731,58.898 Q3.1@4.801,58.898 5.517,58.898 R24.1@5.517,58.995 R24.1@5.532,59.082
3V3APLL: C16.2 C87.2 IC3.1 IC3.2 IC3.3 IC9.13 R3.2 R57.2 TP1.1
  other v3: 16.799,41.782 18.033,42.93 18.198,43.515
  other v4: 2.836,49.69 3.436,49.69 4.036,49.69 2.836,50.29 3.436,50.29 4.036,50.29 2.836,50.89 3.436,50.89 4.036,50.89
3V3APLL_EN: C14.2 IC3.5 R1.2 R2.2 | length 4.4
  Bottom Layer w0.117: R1.2@-1.061,50.961 -0.779,50.961 ; R2.2@-0.438,50.851 R2.2@-0.548,50.961 ; C14.2@0.327,50.961 -0.438,50.961 R2.2@-0.548,50.961 ; v3(0.718,52.383) -0.704,52.383 -0.779,52.309 -0.779,50.961 ; -0.779,50.961 R2.2@-0.548,50.961
3V3PS: C28.2 C103.2 C104.2 C105.2 IC4.1 IC4.2 IC4.3 IC10.2 IC10.3 R8.2 TP3.1
  other v3: 48.856,5.622 49.497,5.622
  other v4: 9.869,56.152 10.469,56.152 11.069,56.152 9.869,56.752 10.469,56.752 11.069,56.752 9.869,57.352 10.469,57.352 11.069,57.352 34.176,59.332 34.776,59.332 35.376,59.332
3V3PS_EN: C43.1 IC4.5 R21.2 R22.2 | length 7
  Bottom Layer w0.117: R21.2@3.174,57.963 3.174,58.723 C43.1@3.174,59.488 ; C43.1@3.174,59.713 7.751,59.713 v3(7.751,58.845)
ABS0: J2.6 R35.1 | length 3.8
  Top Layer w0.117: R35.1@21.904,34.487 21.904,34.482 ccw(c23.471,34.482) v3(23.471,32.915)
  Bottom Layer w0.117: J2.6@22.171,32.915 v3(23.471,32.915)
ABS1: J3.6 R43.1 | length 3.8
  Top Layer w0.117: R43.1@21.904,20.237 21.904,20.232 ccw(c23.471,20.232) v3(23.471,18.665)
  Bottom Layer w0.117: J3.6@22.171,18.665 v3(23.471,18.665)
ADJ_SCL: IC8.12 J4.D8 RN1.3 W5.2 | length 170
  Top Layer w0.117: IC8.12@33.817,0.233 v3(33.817,-0.803) 33.817,-1.131 ccw(c33.944,-1.131) 33.943,-1.258 RN1.3@33.967,-1.323
  Slow_Ctrl w0.137: W5.2@7.268,48.994 cw(c7.268,50.584) 5.679,50.584 5.679,52.666 cw(c7.326,52.666) 7.326,54.313 63.73,54.313 cw(c63.73,51.773) 66.27,51.773 66.27,45.738 ccw(c67.108,45.738) v3(67.108,44.9) 69.314,44.9 cw(c69.314,42.236) 71.978,42.236 71.978,-2.281 cw(c69.438,-2.281) 69.438,-4.821 36.357,-4.821 cw(c36.357,-2.281) 33.817,-2.281 v3(33.817,-0.803)
ADJ_SDA: IC8.13 J4.D9 RN1.2 W6.2 | length 163
  Top Layer w0.117: RN1.2@34.367,-1.323 34.367,-0.903 cw(c34.467,-0.903) v3(34.467,-0.803) IC8.13@34.467,0.233
  Slow_Ctrl w0.137: W6.2@7.268,45.925 ccw(c7.268,47.206) 8.549,47.206 8.549,52.622 cw(c9.622,52.622) 9.622,53.696 63.46,53.696 cw(c63.46,51.487) 65.67,51.487 65.67,45.068 ccw(c67.108,45.068) v3(67.108,43.63) 69.01,43.63 cw(c69.01,43.034) 69.607,43.034 69.607,32.719 cw(c67.969,32.719) 69.127,31.562 68.653,31.087 ccw(c69.271,30.47) 68.397,30.47 68.397,27.687 ccw(c70.604,27.687) 69.043,26.127 69.885,25.285 cw(c69.096,24.496) 70.211,24.496 70.211,1.334 cw(c69.01,1.334) 69.01,0.133 60.897,0.133 ccw(c60.897,-2.407) 58.357,-2.407 cw(c57.118,-2.407) 57.118,-3.646 36.04,-3.646 cw(c36.04,-2.072) 34.467,-2.072 v3(34.467,-0.803)
BEAT_0_N: C11_l0.1 J4.H8 | length 20.8
  Top Layer w0.099: v3(49.061,43.936) ccw(c49.211,43.936) 49.211,43.787 59.14,43.787 ccw(c59.14,44.435) 59.789,44.435 59.789,46.235 cw(c60.933,46.235) 60.933,47.379 62.738,47.379 cw(c62.738,46.362) 63.756,46.362 63.756,46.19 cw(c62.948,46.19) 62.948,45.383 62.51,45.383 ccw(c62.51,44.9) v3(62.028,44.9)
BEAT_0_P: C10_l0.1 J4.H7 | length 20.8
  Top Layer w0.099: v3(49.061,43.333) cw(c49.211,43.333) 49.211,43.482 52.438,43.482 52.748,43.482 cw(c52.748,43.305) 52.924,43.305 52.924,43.041 ccw(c53.101,43.041) 53.277,43.041 53.277,43.305 cw(c53.454,43.305) 53.454,43.482 53.503,43.482 59.14,43.482 ccw(c59.14,44.435) 60.094,44.435 60.094,46.235 cw(c60.933,46.235) 60.933,47.074 62.738,47.074 cw(c62.738,46.362) 63.451,46.362 63.451,46.19 cw(c62.948,46.19) 62.948,45.687 62.51,45.687 cw(c62.51,46.17) v3(62.028,46.17)
BEAT_1_N: C11_l1.1 J4.H26 | length 24.9
  Top Layer w0.099: v3(49.06,13.209) ccw(c49.209,13.209) 49.209,13.06 49.62,13.06 ccw(c49.62,13.527) 50.087,13.527 50.087,17.762 cw(c51.276,17.762) 51.276,18.952 54.931,18.952 54.98,18.952 ccw(c54.98,19.128) 55.157,19.128 55.157,19.393 cw(c55.333,19.393) 55.51,19.393 55.51,19.128 ccw(c55.686,19.128) 55.686,18.952 56.943,18.952 62.074,18.952 ccw(c62.074,20.207) 63.329,20.207 63.329,22.008 ccw(c62.814,22.008) 62.814,22.523 62.51,22.523 ccw(c62.51,22.04) v3(62.028,22.04)
BEAT_1_P: C10_l1.1 J4.H25 | length 24.9
  Top Layer w0.099: v3(49.06,12.606) cw(c49.209,12.606) 49.209,12.755 49.62,12.755 ccw(c49.62,13.527) 50.392,13.527 50.392,17.762 cw(c51.276,17.762) 51.276,18.647 62.074,18.647 ccw(c62.074,20.207) 63.634,20.207 63.634,22.008 ccw(c62.814,22.008) 62.814,22.827 62.51,22.827 cw(c62.51,23.31) v3(62.028,23.31)
BEAT_2_N: C11_l2.1 J4.H20 | length 21.5
  Top Layer w0.099: v3(49.06,23.799) ccw(c49.209,23.799) 49.209,23.65 50.649,23.65 50.699,23.65 ccw(c50.699,23.826) 50.875,23.826 50.875,24.091 cw(c51.052,24.091) 51.228,24.091 51.228,23.826 ccw(c51.405,23.826) 51.405,23.65 51.776,23.65 52.008,23.65 ccw(c52.008,24.7) 53.059,24.7 53.059,25.864 cw(c54.598,25.864) 54.598,27.403 62.041,27.403 ccw(c62.041,28.691) 63.329,28.691 63.329,29.628 ccw(c62.814,29.628) 62.814,30.143 62.51,30.143 ccw(c62.51,29.66) v3(62.028,29.66)
BEAT_2_P: C10_l2.1 J4.H19 | length 21.5
  Top Layer w0.099: v3(49.06,23.196) cw(c49.209,23.196) 49.209,23.345 52.008,23.345 ccw(c52.008,24.7) 53.363,24.7 53.363,25.864 cw(c54.598,25.864) 54.598,27.098 62.041,27.098 ccw(c62.041,28.691) 63.634,28.691 63.634,29.628 ccw(c62.814,29.628) 62.814,30.447 62.51,30.447 cw(c62.51,30.93) v3(62.028,30.93)
BEAT_3_N: C11_l3.1 J4.H14 | length 18.9
  Top Layer w0.099: v3(49.06,35.113) ccw(c49.209,35.113) 49.209,34.964 51.815,34.964 51.864,34.964 ccw(c51.864,35.14) 52.041,35.14 52.041,35.405 cw(c52.218,35.405) 52.394,35.405 52.394,35.14 ccw(c52.571,35.14) 52.571,34.964 52.973,34.964 62.056,34.964 ccw(c62.056,36.237) 63.329,36.237 63.329,37.248 ccw(c62.814,37.248) 62.814,37.763 62.51,37.763 ccw(c62.51,37.28) v3(62.028,37.28)
BEAT_3_P: C10_l3.1 J4.H13 | length 18.9
  Top Layer w0.099: v3(49.06,34.51) cw(c49.209,34.51) 49.209,34.659 62.056,34.659 ccw(c62.056,36.237) 63.634,36.237 63.634,37.248 ccw(c62.814,37.248) 62.814,38.067 62.51,38.067 cw(c62.51,38.55) v3(62.028,38.55)
BEAT_l0_N: C11_l0.2 IC1_l0.10 | length 1.9
  Bottom Layer w0.099: IC1_l0.10@46.229,43.884 ccw(c46.327,43.884) 46.327,43.786 47.575,43.786 ccw(c47.575,44.072) C11_l0.2@47.861,44.072
BEAT_l0_P: C10_l0.2 IC1_l0.11 | length 1.9
  Bottom Layer w0.099: IC1_l0.11@46.229,43.384 cw(c46.327,43.384) 46.327,43.481 47.576,43.481 cw(c47.576,43.196) C10_l0.2@47.861,43.196
BEAT_l1_N: C11_l1.2 IC1_l1.10 | length 1.9
  Bottom Layer w0.099: IC1_l1.10@46.228,13.157 ccw(c46.326,13.157) 46.326,13.059 47.574,13.059 ccw(c47.574,13.345) C11_l1.2@47.86,13.345
BEAT_l1_P: C10_l1.2 IC1_l1.11 | length 1.9
  Bottom Layer w0.099: IC1_l1.11@46.228,12.657 cw(c46.326,12.657) 46.326,12.754 47.575,12.754 cw(c47.575,12.469) C10_l1.2@47.86,12.469
BEAT_l2_N: C11_l2.2 IC1_l2.10 | length 1.9
  Bottom Layer w0.099: IC1_l2.10@46.228,23.747 ccw(c46.326,23.747) 46.326,23.649 47.574,23.649 ccw(c47.574,23.935) C11_l2.2@47.86,23.935
BEAT_l2_P: C10_l2.2 IC1_l2.11 | length 1.9
  Bottom Layer w0.099: IC1_l2.11@46.228,23.247 cw(c46.326,23.247) 46.326,23.344 47.575,23.344 cw(c47.575,23.059) C10_l2.2@47.86,23.059
BEAT_l3_N: C11_l3.2 IC1_l3.10 | length 1.9
  Bottom Layer w0.099: IC1_l3.10@46.228,35.061 ccw(c46.326,35.061) 46.326,34.963 47.574,34.963 ccw(c47.574,35.249) C11_l3.2@47.86,35.249
BEAT_l3_P: C10_l3.2 IC1_l3.11 | length 1.9
  Bottom Layer w0.099: IC1_l3.11@46.228,34.561 cw(c46.326,34.561) 46.326,34.658 47.575,34.658 cw(c47.575,34.373) C10_l3.2@47.86,34.373
BYPASS_N: R63B.1 R64B.2 | length 7.6
  Bottom Layer w0.117: R64B.2@41.282,6.914 R63B.1@48.853,6.914
BYPASS_P: R59B.2 R60B.2 | length 7.6
  Bottom Layer w0.117: R60B.2@41.282,8.563 v3(48.853,8.563)
CLK_3V3: IC10.23 TP12.1 U3.9 | length 20.5
  Top Layer w0.117: v3(41.965,5.399) 42.388,5.421 IC10.23@42.754,5.513
  uStrip1 w0.102: v3(53.169,1.165) 55.013,1.165 ccw(c55.013,1.524) 55.372,1.524 v1(55.372,3.901)
  Slow_Ctrl w0.137: v3(41.965,5.399) ccw(c41.965,5.019) 41.586,5.019 41.586,3.777 ccw(c44.126,3.777) 42.33,1.981 42.776,1.534 ccw(c43.666,2.424) 43.666,1.165 v3(53.169,1.165)
CLK_PS: J4.G13 U3.3 | length 50.4
  Top Layer w0.117: U3.3@53.129,0.03 U3.3@53.166,0.266
  Top Layer w0.127: U3.3@53.169,0.266 53.206,0.03 53.282,-0.209 cw(c52.886,-0.335) 53.298,-0.282 v3(53.422,-1.242)
  Clocks w0.137: v3(54.969,16.003) 56.552,16.003 ccw(c56.552,17.677) 57.736,16.493 58.22,16.977 ccw(c56.829,18.368) 58.796,18.368 v3(58.796,36.653)
  Slow_Ctrl w0.137: v3(53.422,-1.242) 53.422,-0.627 cw(c55.745,-0.627) 54.102,1.016 54.385,1.299 ccw(c53.736,1.948) 54.509,1.453 54.588,1.576 ccw(c54.234,1.803) 54.654,1.803 54.654,2.508 ccw(c54.07,2.508) 54.483,2.921 cw(c55.234,3.672) 54.172,3.672 54.172,14.993 cw(c54.686,14.993) 54.323,15.356 v3(54.969,16.003)
  Bottom Layer w0.127: v3(58.796,36.653) 63.349,36.653 ccw(c63.349,37.263) 63.959,37.263 63.959,37.889 ccw(c63.298,37.889) J4.G13@63.297,38.55
CLN_RXUSRCLK_N: C70.2 J4.D5 | length 48.8
  uStrip2 w0.094: v1(25.359,51.898) cw(c25.359,52.047) 25.211,52.047 25.211,53.46 cw(c25.93,53.46) 25.93,54.179 27.878,54.179 28.273,54.179 cw(c28.273,54.005) 28.447,54.005 28.447,53.977 ccw(c28.621,53.977) 28.795,53.977 28.795,54.005 cw(c28.969,54.005) 28.969,54.179 29.253,54.179 63.822,54.179 cw(c63.822,53.197) 64.805,53.197 64.805,50.328 ccw(c65.94,50.328) 65.94,49.193 66.625,49.193 cw(c66.625,48.71) v2(67.108,48.71)
  other v5: 25.359,51.898
CLN_RXUSRCLK_P: C69.2 J4.D4 | length 48.8
  uStrip2 w0.094: v1(24.758,51.898) ccw(c24.758,52.047) 24.906,52.047 24.906,53.46 cw(c25.93,53.46) 25.93,54.484 63.822,54.484 cw(c63.822,53.197) 65.109,53.197 65.109,50.328 ccw(c65.94,50.328) 65.94,49.497 66.625,49.497 ccw(c66.625,49.98) v2(67.108,49.98)
  other v5: 24.758,51.898
DDCLK0_N: C80.1 IC9.41 | length 1
  Top Layer w0.099: IC9.41@28.008,46.28 cw(c28.106,46.28) 28.106,46.378 28.725,46.378 cw(c28.725,46.255) C80.1@28.848,46.255
DDCLK0_P: C78.1 IC9.42 | length 1
  Top Layer w0.099: IC9.42@28.008,46.78 ccw(c28.106,46.78) 28.106,46.683 28.725,46.683 ccw(c28.725,46.805) C78.1@28.848,46.805
DDCLK1_N: C82.1 IC9.37 | length 1
  Top Layer w0.099: IC9.37@28.008,44.28 cw(c28.106,44.28) 28.106,44.378 28.725,44.378 cw(c28.725,44.255) C82.1@28.848,44.255
DDCLK1_P: C81.1 IC9.38 | length 1
  Top Layer w0.099: IC9.38@28.008,44.78 ccw(c28.106,44.78) 28.106,44.683 28.725,44.683 ccw(c28.725,44.805) C81.1@28.848,44.805
DDCLK2_N: C84.1 IC9.34 | length 1
  Top Layer w0.099: IC9.34@28.008,42.78 cw(c28.106,42.78) 28.106,42.878 28.725,42.878 cw(c28.725,42.755) C84.1@28.848,42.755
DDCLK2_P: C83.1 IC9.35 | length 1
  Top Layer w0.099: IC9.35@28.008,43.28 ccw(c28.106,43.28) 28.106,43.183 28.725,43.183 ccw(c28.725,43.305) C83.1@28.848,43.305
DDCLK3_N: C86.1 IC9.30 | length 1
  Top Layer w0.099: C86.1@26.283,40.741 ccw(c26.283,40.863) 26.406,40.863 26.406,41.483 ccw(c26.308,41.483) IC9.30@26.308,41.58
DDCLK3_P: C85.1 IC9.31 | length 1
  Top Layer w0.099: IC9.31@26.808,41.58 ccw(c26.808,41.483) 26.711,41.483 26.711,40.863 ccw(c26.833,40.863) C85.1@26.833,40.741
DDCLK4_N: C92.1 IC9.27 | length 1
  Top Layer w0.099: C92.1@24.783,40.741 ccw(c24.783,40.863) 24.906,40.863 24.906,41.483 ccw(c24.808,41.483) IC9.27@24.808,41.58
DDCLK4_P: C91.1 IC9.28 | length 1
  Top Layer w0.099: IC9.28@25.308,41.58 ccw(c25.308,41.483) 25.211,41.483 25.211,40.863 ccw(c25.333,40.863) C91.1@25.333,40.741
DFF_IN_l0_N: IC1_l0.3 IC2_l0.11 | length 5.8
  Bottom Layer w0.099: IC2_l0.11@38.542,42.339 38.567,42.364 38.567,42.916 38.567,43.081 cw(c39.272,43.081) 39.272,43.786 43.132,43.786 IC1_l0.3@43.156,43.811
DFF_IN_l0_P: IC1_l0.2 IC2_l0.12 | length 5.8